# Altium PCB NB2DSK01.PcbDoc (part 11 of 17)
Units mil, origin at the board's own origin, x right, y up, seen from the top; angles counter-clockwise.
Board outline 11815 x 6500.03 mil, 8 copper layers (Top Layer, MidLayer1, MidLayer2, GND, PWR, MidLayer3, MidLayer4, Bottom Layer), stack 74.62 mil thick; 798 components, 1002 nets, 3927 pads, 3182 vias.
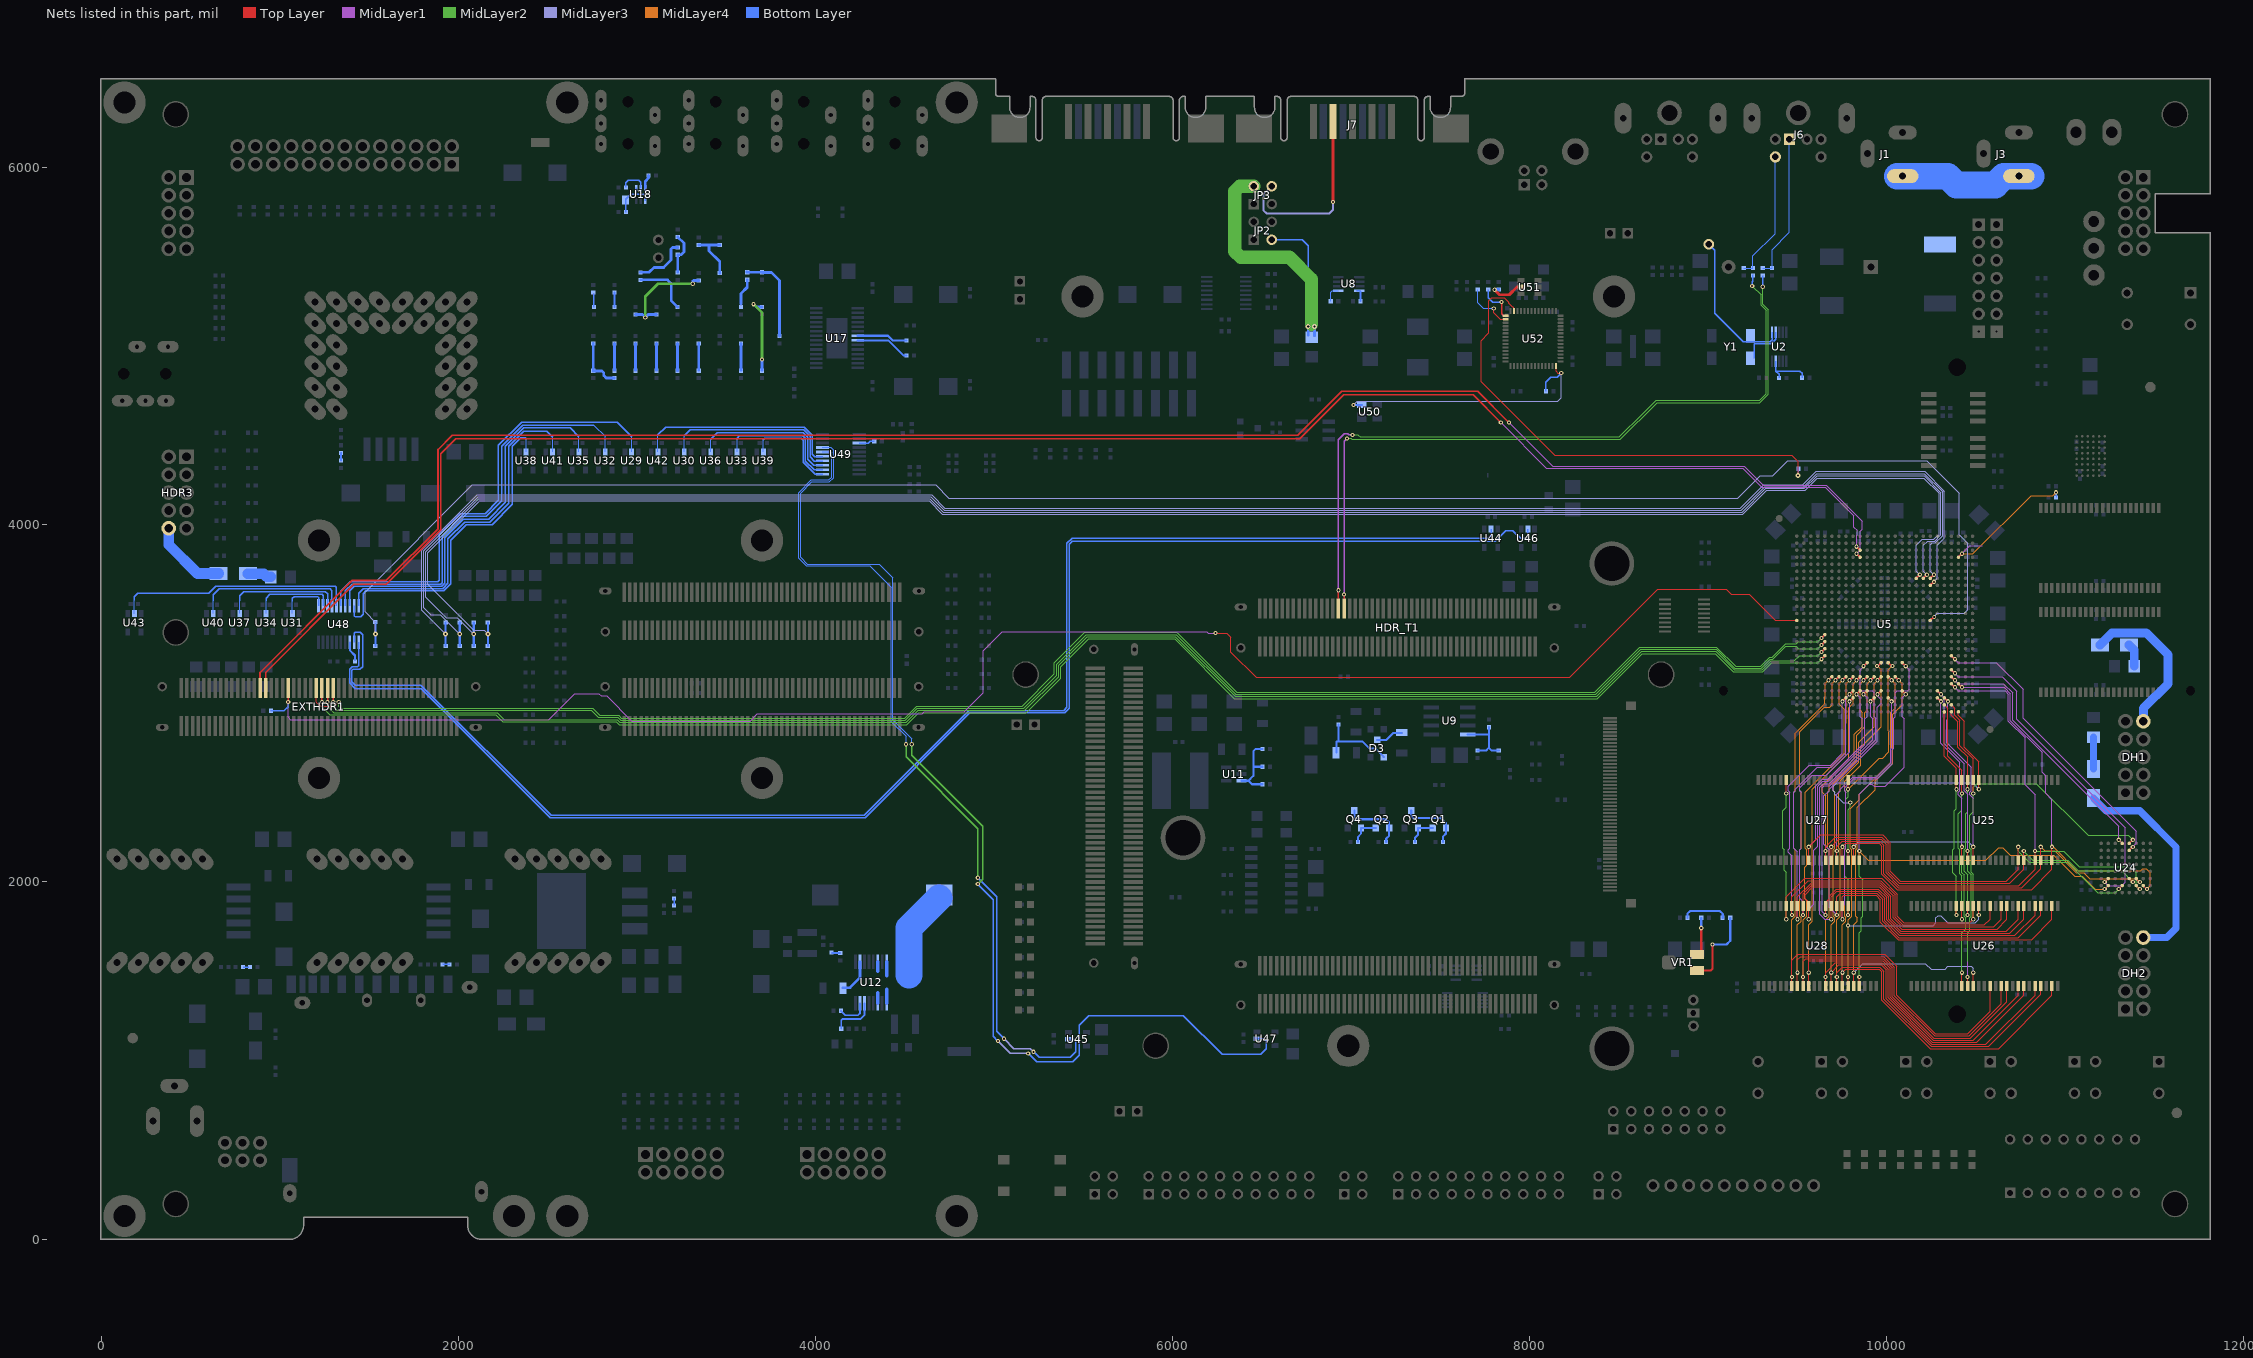
[diagram p17: the nets of this part, all layers, seen from the top]

## Via types
v1: diameter 23.62, hole 11.81, Top Layer to Bottom Layer, tented both sides, 1950 vias
v2: diameter 27.56, hole 11.81, Top Layer to Bottom Layer, tented both sides, 679 vias
v3: diameter 23.62, hole 11.81, Top Layer to Bottom Layer, 194 vias
v4: diameter 31.5, hole 11.81, Top Layer to Bottom Layer, tented both sides, 178 vias
v5: diameter 21.65, hole 11.81, Top Layer to Bottom Layer, tented both sides, 67 vias
v6: diameter 23.62, hole 11.81, Top Layer to Bottom Layer, tented bottom, 53 vias
v7: diameter 26, hole 11.81, Top Layer to Bottom Layer, tented both sides, 21 vias
v8: diameter 26, hole 11.81, Top Layer to Bottom Layer, 13 vias
v9: diameter 28, hole 11.81, Top Layer to Bottom Layer, 8 vias
v10: diameter 25.59, hole 11.81, Top Layer to Bottom Layer, tented both sides, 7 vias
v11: diameter 39.37, hole 11.81, Top Layer to Bottom Layer, tented both sides, 5 vias
v12: diameter 30, hole 11.81, Top Layer to Bottom Layer, 3 vias
v13: diameter 30, hole 11.81, Top Layer to Bottom Layer, tented both sides, 2 vias
v14: diameter 23, hole 11.81, Top Layer to Bottom Layer, tented both sides, 1 vias
v15: diameter 26.56, hole 11.81, Top Layer to Bottom Layer, tented both sides, 1 vias

## Nets (pads, with @x,y where several pads share a name; then routed paths per layer and width w, separated by ;. In a path a pad name is that pad's centre, name@x,y a point inside that pad or via, vN(x,y) a via of type N, cw(c..) or ccw(c..) an arc to the next point about the centre after c; other vN are vias at no path point) (continued)
MEM.BUS_D11: U5.AC10 U24.G4 U25.47 U27.32 | length 3388.4
  Top Layer w5: U27.32@9562.99,2122.05 v1(9562.99,2196.85) 9629.92,2263.78 9976.38,2263.78 10019.69,2220.47 10019.69,2059.06 10074.8,2003.94 10669.29,2003.94 10736.22,2070.87 U25.47@10736.22,2122.05 v1(10736.22,2196.85) ; v1(11299.21,1960.45) U24.G4@11318.9,1980.14
  Top Layer w7.87: v1(9830.71,3051.18) U5.AC10@9850.39,3070.87
  MidLayer1 w5: v1(9562.99,2196.85) 9602.36,2236.22 9602.36,2539.37 9637.8,2574.8 9669.29,2574.8 9862.2,2767.72 9862.2,2870.08 9862.2,2889.76 9862.2,2913.39 9850.39,2925.2 9850.39,3031.5 v1(9830.71,3051.18)
  MidLayer2 w5: v1(10736.22,2196.85) 10736.22,2173.23 10799.21,2110.24 11011.81,2110.24 11181.55,1940.5 11279.26,1940.5 v1(11299.21,1960.45)
MEM.BUS_D12: U5.AA10 U24.F5 U25.48 U27.35 | length 3327.5
  Top Layer w5: U27.35@9657.48,2122.05 v1(9657.48,2173.23) 9657.48,2196.85 9712.6,2251.97 9972.44,2251.97 10007.87,2216.54 10007.87,2055.12 10070.87,1992.13 10688.98,1992.13 10767.72,2070.87 U25.48@10767.72,2122.05 v1(10767.72,2173.23) ; U24.F5@11358.27,2019.51 v1(11377.95,1999.82)
  Top Layer w7.87: v1(9830.71,3129.92) U5.AA10@9850.39,3149.61
  MidLayer2 w5: v1(10767.72,2173.23) 10818.9,2122.05 11014.14,2122.05 11073.38,2062.81 11314.96,2062.81 v1(11377.95,1999.82)
  MidLayer4 w5: v1(9657.48,2173.23) 9657.48,2484.25 9637.8,2503.94 9637.8,2539.37 9754.26,2655.84 9787.4,2688.98 9787.4,2870.08 9787.4,2889.76 9787.4,2976.38 9811.02,3000 9811.02,3110.24 v1(9830.71,3129.92)
MEM.BUS_D13: U5.AB23 U24.G6 U25.50 U27.36 | length 3604.8
  Top Layer w5: U27.36@9688.98,2122.05 v1(9688.98,2196.85) 9732.28,2240.16 9968.5,2240.16 9996.06,2212.6 9996.06,2051.18 10066.93,1980.32 10740.16,1980.32 10830.71,2070.87 U25.50@10830.71,2122.05 v1(10830.71,2173.23) ; U24.G6@11397.64,1980.14 v1(11417.32,1960.45)
  Top Layer w7.87: U5.AB23@10362.2,3110.24 v1(10381.89,3090.55)
  MidLayer1 w5: v1(10381.89,3090.55) 10401.58,3070.87 10663.02,3070.87 10681.1,3052.79 10681.1,2901.03 10775.59,2806.54 10775.59,2543.31 10830.71,2488.19 v1(10830.71,2173.23)
  MidLayer2 w5: v1(10830.71,2173.23) 10991.25,2173.23 11078.04,2086.44 11362.2,2086.44 11397.64,2051 11397.64,1980.14 v1(11417.32,1960.45)
MEM.BUS_D14: U5.AD14 U24.F6 U25.51 U27.37 | length 3331.5
  Top Layer w5: U27.37@9720.47,2122.05 9720.47,2196.85 9751.97,2228.35 9960.63,2228.35 9984.25,2204.72 9984.25,2047.24 10062.99,1968.5 10755.91,1968.5 10862.21,2074.8 U25.51@10862.21,2122.05 v1(10862.21,2196.85) ; U24.F6@11397.64,2019.51 v1(11417.32,1999.82)
  Top Layer w7.87: U5.AD14@10007.87,3031.5 v1(10027.56,3011.81)
  MidLayer1 w5: v1(9720.47,2173.23) 9720.47,2492.13 9740.16,2511.81 9740.16,2519.69 9808.47,2588 9941.3,2588 10021,2667.7 10021,2745.41 10027.56,2751.97 10027.56,2870.08 10027.56,2889.77 v1(10027.56,3011.81)
  MidLayer4 w5: v1(10862.21,2196.85) 10884.56,2174.49 10939.51,2174.49 11061.18,2052.82 11103.61,2052.82 11136.92,2019.51 11397.64,2019.51 v1(11417.32,1999.82)
MEM.BUS_D15: U5.AB24 U24.G7 U25.53 U27.38 | length 3639.8
  Top Layer w5: U27.38@9751.97,2122.05 v1(9751.97,2196.85) 9771.65,2216.54 9956.69,2216.54 9972.44,2200.79 9972.44,2043.31 10059.06,1956.69 10811.02,1956.69 10925.2,2070.87 U25.53@10925.2,2122.05 v1(10925.2,2196.85) ; U24.G7@11437.01,1980.14 v1(11456.69,1960.45)
  Top Layer w7.87: U5.AB24@10401.58,3110.24 v1(10421.26,3090.55)
  MidLayer1 w5: v1(10421.26,3090.55) 10543.31,3090.55 10562.99,3090.55 10657.48,3090.55 10692.91,3055.12 10692.91,2903.36 10870.08,2726.2 10870.08,2614.17 10889.76,2594.49 10889.76,2496.06 10925.2,2460.63 v1(10925.2,2196.85)
  MidLayer4 w5: v1@10931.29,2196.85 11065.33,2062.82 11421.26,2062.82 11433.07,2074.63 11452.76,2074.63 11476.38,2051 11476.38,1980.14 v1(11456.69,1960.45)
MEM.BUS_D16: U5.W16 U26.2 U28.7 | length 3327.3
  Top Layer w5: v1(9751.97,1791.34) U28.7@9751.97,1866.14 9751.97,1917.32 9759.84,1925.2 9940.94,1925.2 9964.57,1901.57 9964.57,1775.59 10062.99,1677.17 10811.02,1677.17 10925.2,1791.34 U26.2@10925.2,1866.14
  Top Layer w7.87: U5.W16@10086.61,3228.35 v1(10106.3,3208.66)
  MidLayer1 w5: v1(9751.97,1791.34) 9751.97,1862.2 9763.78,1874.02 9763.78,2181.1 9771.65,2188.98 9771.65,2503.94 9763.78,2511.81 9763.78,2527.56 9814.22,2578 9945.44,2578 10031,2663.56 10031,2739.66 10039.37,2748.03 10039.37,2870.08 10039.37,2889.76 10039.37,2917.32 10047.24,2925.2 10047.24,3059.06 10059.06,3070.87 10118.11,3070.87 10125.98,3078.74 10125.98,3188.98 v1(10106.3,3208.66)
MEM.BUS_D17: U5.AC13 U26.4 U28.8 | length 2966.9
  Top Layer w5: v1(9720.47,1814.96) U28.8@9720.47,1866.14 9720.47,1917.32 9740.16,1937.01 9943.27,1937.01 9976.38,1903.9 9976.38,1779.53 10066.93,1688.98 10737.18,1688.98 10862.21,1814 U26.4@10862.21,1866.14
  Top Layer w7.87: v1(9948.82,3051.18) U5.AC13@9968.5,3070.87
  MidLayer1 w5: v1(9720.47,1814.96) 9696.85,1838.58 9677.5,1857.93 9677.5,2180.7 9647.8,2210.4 9647.8,2482.2 9676.79,2511.19 9676.79,2519.31 9947.01,2789.53 9947.01,2978.5 9968.5,3000 9968.5,3020.8 9948.82,3040.48 v1(9948.82,3051.18)
MEM.BUS_D18: U5.AD12 U26.5 U28.9 | length 2996.6
  Top Layer w5: v1(9688.98,1791.34) U28.9@9688.98,1866.14 9688.98,1917.32 9720.47,1948.82 9948.82,1948.82 9988.19,1909.45 9988.19,1783.46 10070.87,1700.79 10716.5,1700.79 10830.71,1815 U26.5@10830.71,1866.14
  Top Layer w7.87: v1(9909.45,3011.81) U5.AD12@9929.13,3031.5
  MidLayer1 w5: v1(9688.98,1791.34) 9653.54,1791.34 9625.98,1818.9 9625.98,2531.5 9645.67,2551.18 9677.17,2551.18 9921.26,2795.28 9921.26,2870.08 9921.26,2889.76 9921.26,2913.39 9909.45,2925.2 v1(9909.45,3011.81)
MEM.BUS_D19: U5.W11 U26.7 U28.10 | length 3141.9
  Top Layer w5: U28.10@9653.54,1881.89 9677.17,1905.51 9677.17,1921.26 9716.54,1960.63 9952.76,1960.63 10000,1913.39 10000,1787.4 10074.8,1712.6 10688.98,1712.6 10767.72,1791.34 U26.7@10767.72,1866.14 ; v1(9657.48,1814.96) U28.10@9657.48,1866.14
  Top Layer w7.87: v1(9870.08,3208.66) U5.W11@9889.76,3228.35
  MidLayer1 w5: v1(9657.48,1814.96) 9637.8,1834.65 9637.8,2527.56 9649.61,2539.37 9681.1,2539.37 9937.01,2795.28 9937.01,2870.08 9937.01,2889.76 9937.01,2917.32 9929.13,2925.2 9929.13,3059.06 9917.32,3070.87 9858.27,3070.87 9850.39,3078.74 9850.39,3188.98 v1(9870.08,3208.66)
MEM.BUS_D20: U5.AC11 U26.8 U28.13 | length 3065.8
  Top Layer w5: v1(9562.99,1791.34) U28.13@9562.99,1866.14 ; U28.13@9562.99,1885.83 9543.31,1905.51 9543.31,1929.13 9586.61,1972.44 9956.69,1972.44 10011.81,1917.32 10011.81,1791.34 10078.74,1724.41 10669.29,1724.41 10736.22,1791.34 U26.8@10736.22,1866.14
  Top Layer w7.87: v1(9870.08,3051.18) U5.AC11@9889.76,3070.87
  MidLayer1 w5: v1(9562.99,1791.34) 9562.99,1846.46 9590.55,1874.02 9590.55,2177.17 9614.17,2200.79 9614.17,2535.43 9641.73,2562.99 9673.23,2562.99 9877.95,2767.72 9877.95,2870.08 9877.95,2889.76 9877.95,2913.39 9889.76,2925.2 9889.76,3031.5 v1(9870.08,3051.18)
MEM.BUS_D21: U5.AD9 U26.10 U28.14 | length 2956.5
  Top Layer w5: v1(9531.5,1814.96) U28.14@9531.5,1866.14 9531.5,1933.07 9582.68,1984.25 9960.63,1984.25 10023.62,1921.26 10023.62,1795.28 10082.68,1736.22 10618.11,1736.22 10673.23,1791.34 U26.10@10673.23,1866.14
  Top Layer w7.87: v1(9791.34,3011.81) U5.AD9@9811.02,3031.5
  MidLayer1 w5: v1(9531.5,1814.96) 9531.5,1889.76 9511.81,1909.45 9511.81,2181.1 9519.69,2188.98 9519.69,2503.94 9511.81,2511.81 9511.81,2527.56 9582.68,2598.43 9661.42,2598.43 9791.34,2728.35 9791.34,2870.08 9791.34,2889.77 v1(9791.34,3011.81)
MEM.BUS_D22: U5.AC9 U26.11 U28.15 | length 3039.5
  Top Layer w5: v1(9500,1791.34) U28.15@9500,1866.14 9500,1917.32 9578.74,1996.06 9962.96,1996.06 10035.43,1923.59 10035.43,1799.21 10086.61,1748.03 10598.42,1748.03 10641.73,1791.34 U26.11@10641.73,1866.14
  Top Layer w7.87: v1(9791.34,3051.18) U5.AC9@9811.02,3070.87
  MidLayer1 w5: v1(9500,1791.34) 9500,2169.29 9480.32,2188.98 9480.32,2503.94 9488.19,2511.81 9488.19,2519.69 9610.24,2641.73 9688.98,2641.73 9771.65,2724.41 9771.65,2870.08 9771.65,2889.76 9771.65,3031.5 v1(9791.34,3051.18)
MEM.BUS_D23: U5.AD8 U26.13 U28.16 | length 2947.9
  Top Layer w5: v1(9468.5,1814.96) U28.16@9468.5,1866.14 9468.5,1917.32 9559.06,2007.87 9967.26,2007.87 10047.24,1927.89 10047.24,1803.15 10090.55,1759.84 10547.24,1759.84 10578.74,1791.34 U26.13@10578.74,1866.14
  Top Layer w7.87: v1(9751.97,3011.81) U5.AD8@9771.65,3031.5
  MidLayer1 w5: v1(9468.5,1814.96) 9468.5,2145.67 9448.82,2165.35 9448.82,2181.1 9456.69,2188.98 9456.69,2503.94 9448.82,2511.81 9448.82,2535.43 9566.93,2653.54 9685.04,2653.54 9751.97,2720.47 v1(9751.97,3011.81)
MEM.BUS_D24: U5.AA6 U26.42 U28.29 | length 3522
  Top Layer w5: U28.29@9468.5,1417.32 v1(9468.5,1468.5) 9468.5,1562.5 9500.49,1594.49 9988.19,1594.49 10055.12,1527.56 10055.12,1366.14 10271.65,1149.61 10452.76,1149.61 10578.74,1275.59 U26.42@10578.74,1417.32
  Top Layer w7.87: v1(9673.23,3129.92) U5.AA6@9692.91,3149.61
  MidLayer4 w5: v1(9468.5,1468.5) 9468.5,1787.4 9488.19,1807.09 9488.19,2181.1 9480.32,2188.98 9480.32,2503.94 9488.19,2511.81 9488.19,2833.19 9653.54,2998.54 9653.54,3034.59 9653.54,3110.23 v1(9673.23,3129.92)
MEM.BUS_D25: U5.AA7 U26.44 U28.30 | length 3534.2
  Top Layer w5: U28.30@9500,1417.32 v1(9500,1492.13) 9500,1564 9518.68,1582.68 9984.25,1582.68 10043.31,1523.62 10043.31,1362.2 10267.72,1137.8 10460.63,1137.8 10641.73,1318.9 U26.44@10641.73,1417.32
  Top Layer w7.87: v1(9712.6,3129.92) U5.AA7@9732.28,3149.61
  MidLayer4 w5: v1(9500,1492.13) 9500,1759.84 9519.69,1779.53 9519.69,1799.21 9511.81,1807.09 9511.81,2181.1 9519.69,2188.98 9519.69,2503.94 9511.81,2511.81 9511.81,2842.67 9649.14,2980 9681.68,2980 9692.91,2991.24 9692.91,3110.23 v1(9712.6,3129.92)
MEM.BUS_D26: U5.AA8 U26.45 U28.31 | length 3558.3
  Top Layer w5: U28.31@9531.5,1417.32 v1(9531.5,1468.5) 9531.5,1556.5 9545.87,1570.87 9980.32,1570.87 10031.5,1519.69 10031.5,1358.27 10263.78,1125.98 10468.5,1125.98 10673.23,1330.71 U26.45@10673.23,1417.32
  Top Layer w7.87: v1(9751.97,3129.92) U5.AA8@9771.65,3149.61
  MidLayer4 w5: v1(9531.5,1468.5) 9531.5,1787.4 9551.18,1807.09 9551.18,1893.7 9539.37,1905.51 9539.37,2082.68 9551.18,2094.49 9551.18,2181.1 9543.31,2188.98 9543.31,2503.94 9761.65,2722.28 9761.65,2968.43 9732.28,2997.8 9732.28,3110.23 v1(9751.97,3129.92)
MEM.BUS_D27: U5.AA9 U26.47 U28.32 | length 3508.5
  Top Layer w5: U28.32@9562.99,1417.32 v1(9562.99,1492.13) 9562.99,1557.29 9564.76,1559.06 9976.38,1559.06 10019.69,1515.75 10019.69,1354.33 10259.84,1114.17 10484.25,1114.17 10736.22,1366.14 U26.47@10736.22,1417.32
  Top Layer w7.87: v1(9791.34,3129.92) U5.AA9@9811.02,3149.61
  MidLayer4 w5: v1(9562.99,1492.13) 9562.99,1759.84 9582.68,1779.53 9582.68,2519.69 9771.65,2708.66 9771.65,2870.08 9771.65,2889.76 9771.65,3110.23 v1(9791.34,3129.92)
MEM.BUS_D28: U5.AA11 U26.48 U28.35 | length 3440.8
  Top Layer w5: U28.35@9657.48,1417.32 v1(9657.48,1468.5) 9657.48,1492.13 9712.6,1547.24 9972.44,1547.24 10007.87,1511.81 10007.87,1350.39 10255.91,1102.36 10503.94,1102.36 10767.72,1366.14 U26.48@10767.72,1417.32
  Top Layer w7.87: v1(9870.08,3129.92) U5.AA11@9889.76,3149.61
  MidLayer4 w5: v1(9657.48,1468.5) 9657.48,1787.4 9677.17,1807.09 9677.17,2181.1 9669.29,2188.98 9669.29,2503.94 9677.17,2511.81 9677.17,2547.24 9818.9,2688.98 9818.9,2826.77 9862.2,2870.08 9862.2,2889.76 9862.2,2948.82 9850.39,2960.63 9850.39,3110.24 v1(9870.08,3129.92)
MEM.BUS_D29: U5.AA12 U26.50 U28.36 | length 3448.6
  Top Layer w5: U28.36@9688.98,1417.32 v1(9688.98,1492.13) 9732.28,1535.43 9968.5,1535.43 9996.06,1507.87 9996.06,1346.46 10251.97,1090.55 10555.12,1090.55 10830.71,1366.14 U26.50@10830.71,1417.32
  Top Layer w7.87: v1(9909.45,3129.92) U5.AA12@9929.13,3149.61
  MidLayer4 w5: v1(9688.98,1492.13) 9688.98,1759.84 9708.66,1779.53 9708.66,1799.21 9700.79,1807.09 9700.79,2181.1 9708.66,2188.98 9708.66,2503.94 9700.79,2511.81 9700.79,2551.18 9830.71,2681.1 9830.71,2822.84 9877.95,2870.08 9877.95,2889.76 9877.95,2948.82 9889.76,2960.63 9889.76,3110.24 v1(9909.45,3129.92)
MEM.BUS_D30: U5.AA13 U26.51 U28.37 | length 3464.4
  Top Layer w5: U28.37@9720.47,1417.32 v1(9720.47,1468.5) 9720.47,1492.13 9751.97,1523.62 9960.63,1523.62 9984.25,1500 9984.25,1342.52 10248.03,1078.74 10570.87,1078.74 10862.21,1370.08 U26.51@10862.21,1417.32
  Top Layer w7.87: v1(9948.82,3129.92) U5.AA13@9968.5,3149.61
  MidLayer4 w5: v1(9720.47,1468.5) 9720.47,1787.4 9740.16,1807.09 9740.16,2181.1 9732.28,2188.98 9732.28,2503.94 9740.16,2511.81 9740.16,2566.93 9842.52,2669.29 9842.52,2783.47 9929.13,2870.08 9929.13,2889.76 9929.13,3110.24 v1(9948.82,3129.92)
MEM.BUS_D31: U5.W13 U26.53 U28.38 | length 3563.1
  Top Layer w5: U28.38@9751.97,1417.32 v1(9751.97,1492.13) 9771.65,1511.81 9956.69,1511.81 9972.44,1496.06 9972.44,1338.58 10244.09,1066.93 10625.99,1066.93 10925.2,1366.14 U26.53@10925.2,1417.32
  Top Layer w7.87: v5@9948.82,3208.66 U5.W13@9968.5,3228.35
  MidLayer4 w5: v1(9751.97,1492.13) 9751.97,1759.84 9771.65,1779.53 9771.65,1799.21 9763.78,1807.09 9763.78,2181.1 9771.65,2188.98 9771.65,2503.94 9763.78,2511.81 9763.78,2562.99 9854.33,2653.54 9854.33,2755.91 9968.5,2870.08 9968.5,2889.76 9968.5,3188.98 v5@9948.82,3208.66
  other v5: 9944.88,3208.66
MEM.BUS_FLASH_NBUSY: U5.AA23 U24.A4 | length 1477.1
  Top Layer w5: v1(11299.21,2236.04) U24.A4@11318.9,2216.36
  Top Layer w7.87: U5.AA23@10362.2,3149.61 v1(10381.89,3129.92)
  MidLayer1 w5: v1(10381.89,3129.92) 10401.58,3110.24 10543.31,3110.24 10562.99,3110.24 10653.54,3110.24 10704.72,3059.06 10704.72,2905.69 11299.21,2311.2 v1(11299.21,2236.04)
MEM.BUS_FLASH_NCS: U5.Y23 U24.F2 | length 1893.3
  Top Layer w5: v1(11220.47,1999.82) U24.F2@11240.16,2019.51
  Top Layer w7.87: U5.Y23@10362.2,3188.98 v1(10381.89,3169.29)
  MidLayer1 w5: v1(10381.89,3169.29) 10401.58,3149.61 10543.31,3149.61 10562.99,3149.61 10645.67,3149.61 10728.35,3066.93 10728.35,2910.36 11334.65,2304.06 11334.65,1999.82 11314.96,1980.14 11240.16,1980.14 v1(11220.47,1999.82)
MEM.BUS_FLASH_NRESET: U5.V23 U24.B5 | length 1660.5
  Top Layer w5: U24.B5@11358.27,2176.99 v1(11377.95,2196.67)
  Top Layer w7.87: U5.V23@10362.2,3267.72 v1(10381.89,3248.03)
  MidLayer1 w5: v1(10381.89,3248.03) 10401.58,3228.35 10543.31,3228.35 10562.99,3228.35 10614.17,3228.35 10763.78,3078.74 10763.78,2917.35 11397.64,2283.49 11397.64,2216.36 v1(11377.95,2196.67)
MEM.BUS_NBE0: U5.AF24 U25.15 U27.39 | length 1798.6
  Top Layer w5: U27.39@9783.46,2122.05 v1(9783.46,2173.23) ; U5.AF24@10401.58,2952.76 10401.58,2933.07 10433.07,2901.58 10433.07,2889.77 10433.07,2870.08 10433.07,2755.91 10515.75,2673.23 U25.15@10515.75,2570.87 v1(10515.75,2519.69)
  MidLayer2 w5: v1(9783.46,2173.23) 9783.46,2405.51 9795.28,2417.32 v1(9795.28,2444.88)
  MidLayer3 w5: v1(9795.28,2444.88) 9755.91,2444.88 9708.66,2492.13 9708.66,2503.94 9700.79,2511.81 9700.79,2535.43 9720.47,2555.12 10480.32,2555.12 v1(10515.75,2519.69)
MEM.BUS_NBE1: U5.AD22 U25.39 U27.40 | length 1755.4
  Top Layer w5: U27.40@9814.96,2122.05 v1(9814.96,2196.85) ; U25.39@10484.25,2122.05 v1(10484.25,2196.85)
  Top Layer w7.87: U5.AD22@10322.83,3031.5 v1(10342.52,3011.81)
  MidLayer1 w5: v1(10342.52,3011.81) 10342.52,2913.24 10335.68,2906.4 10335.68,2778.45 10472.44,2641.69 10472.44,2511.81 10464.57,2503.94 10464.57,2488.19 10484.25,2468.5 v1(10484.25,2196.85)
  MidLayer3 w5: v1(9814.96,2196.85) 9842.52,2224.41 10456.69,2224.41 v1(10484.25,2196.85)
MEM.BUS_NBE2: U5.AA14 U26.15 U28.39 | length 2734.9
  Top Layer w5: U28.39@9783.46,1417.32 v1(9783.46,1468.5) ; v1(10515.75,1814.96) U26.15@10515.75,1866.14
  Top Layer w7.87: U5.AA14@10007.87,3149.61 v1(10027.56,3129.92)
  MidLayer4 w5: v1(9783.46,1468.5) v1(9783.46,1755.91) 9783.46,1787.4 9803.15,1807.09 9803.15,2181.1 9795.28,2188.98 9795.28,2409.45 9846.46,2460.63 9846.46,2492.13 10023.68,2669.35 10023.68,2950.44 10047.24,2974 10047.24,3110.24 v1(10027.56,3129.92)
  MidLayer3 w5: v1(9783.46,1755.91) 10259.84,1755.91 10275.59,1771.65 10275.59,1799.21 10287.4,1811.02 10303.15,1811.02 10342.52,1771.65 10496.06,1771.65 10515.75,1791.34 v1(10515.75,1814.96)
MEM.BUS_NBE3: U5.AA15 U26.39 U28.40 | length 2681
  Top Layer w5: U28.40@9814.96,1417.32 v1(9814.96,1492.13) ; U26.39@10484.25,1417.32 v1(10484.25,1492.13)
  Top Layer w7.87: U5.AA15@10047.24,3149.61 v1(10066.93,3129.92)
  MidLayer4 w5: v1(9814.96,1492.13) 9814.96,1759.84 9834.65,1779.53 9834.65,1799.21 9826.77,1807.09 9826.77,2181.1 9834.65,2188.98 9834.65,2417.32 9934.68,2517.35 9934.68,2566.2 10034.9,2666.43 10034.9,2940.29 10086.61,2992 10086.61,3110.24 v1(10066.93,3129.92)
  MidLayer3 w5: v1(9814.96,1492.13) 9866.14,1543.31 10216.53,1543.31 10248.03,1511.81 10326.77,1511.81 10342.52,1527.56 10472.44,1527.56 10484.25,1515.75 v1(10484.25,1492.13)
MEM.BUS_NOE: U5.AC16 U24.G2 U27.41 U28.41 | length 3466.3
  Top Layer w5: U28.41@9846.46,1417.32 v1(9846.46,1468.5) ; U27.41@9846.46,2122.05 v1(9846.46,2173.23) ; v1(11220.47,1960.45) U24.G2@11240.16,1980.14
  Top Layer w7.87: U5.AC16@10086.61,3070.87 v1(10106.3,3051.18)
  MidLayer1 w5: v1(9846.46,2173.23) 9846.46,2492.13 9902.76,2548.44 9916,2548.44 9928.98,2535.45 9992.62,2535.45 10098.43,2641.26 10098.43,2913.39 10086.62,2925.2 10086.62,3031.5 v1(10106.3,3051.18)
  MidLayer2 w5: v1(9846.46,1468.5) 9846.46,1716.54 9858.27,1728.35 9858.27,1799.21 9866.14,1807.09 9866.14,2011.81 9846.46,2031.5 v1(9846.46,2173.23)
  MidLayer4 w5: v1(9846.46,2173.23) 9897.64,2122.05 10555.12,2122.05 10625.98,2192.91 10649.61,2192.91 10692.07,2150.45 10935.26,2150.45 11052.9,2032.82 11095.32,2032.82 11167.69,1960.45 v1(11220.47,1960.45)
MEM.BUS_NWE: U5.AE23 U24.A5 U25.16 U26.16 U27.17 U28.17 | length 4633.7
  Top Layer w5: v1(9437.01,1791.34) U28.17@9437.01,1866.14 9437.01,1917.32 9539.37,2019.69 9971.45,2019.69 10059.06,1932.08 10059.06,1807.09 10094.49,1771.65 10464.57,1771.65 v1(10484.25,1791.34) U26.16@10484.25,1866.14 ; v1(9437.01,2496.06) U27.17@9437.01,2570.87 ; U5.AE23@10362.2,2992.13 10381.89,2972.44 10381.89,2933.07 10409.45,2905.51 10409.45,2889.76 10409.45,2870.08 10409.45,2763.78 10484.25,2688.98 U25.16@10484.25,2570.87 v1(10484.25,2496.06) ; U24.A5@11358.27,2216.36 v1(11377.95,2236.04)
  MidLayer2 w5: v1(9437.01,1791.34) 9437.01,2011.81 9437.01,2055.12 9425.2,2066.93 9425.2,2181.1 9417.32,2188.98 9417.32,2397.64 9437.01,2417.32 v1(9437.01,2496.06) ; v1(10484.25,1791.34) 10484.25,2043.31 10472.44,2055.12 10472.44,2181.1 10464.57,2188.98 10464.57,2374.02 10484.25,2393.7 v1(10484.25,2496.06) 10484.25,2531.5 10503.94,2551.18 10837.12,2551.18 11127.1,2261.2 11352.8,2261.2 v1(11377.95,2236.04)
MEM.BUS_SDRAM_CKE: U5.AD21 U25.37 U26.37 | length 1768.9
  Top Layer w5: U26.37@10421.26,1417.32 v1(10421.26,1492.13) ; U25.37@10421.26,2122.05 v1(10421.26,2196.85)
  Top Layer w7.87: U5.AD21@10283.46,3031.5 v1(10303.15,3011.81)
  MidLayer1 w5: v1(10303.15,3011.81) 10303.15,2889.76 10303.15,2870.08 10303.15,2776.99 10409.45,2670.68 10409.45,2511.81 10401.58,2503.94 10401.58,2488.19 10421.26,2468.5 v1(10421.26,2196.85)
  MidLayer2 w5: v1(10421.26,1492.13) 10421.26,1716.54 10440.95,1736.22 10440.95,1799.21 10433.07,1807.09 10433.07,2039.37 10421.26,2051.18 10421.26,2059.06 v1(10421.26,2196.85)
MEM.BUS_SDRAM_CLK: NT3.2 U5.AC21 U25.38 U26.38 | length 1875
  Top Layer w5: U26.38@10452.76,1417.32 v1(10452.76,1468.5) ; U25.38@10452.76,2122.05 v1(10452.76,2173.23)
  Top Layer w7.87: U5.AC21@10283.46,3070.87 v1(10303.15,3051.18)
  MidLayer1 w5: v1(10303.15,3051.18) 10322.83,3031.5 10322.83,2889.76 10322.83,2870.08 10322.83,2773.3 10433.07,2663.06 10433.07,2511.81 10452.76,2492.13 v1(10452.76,2173.23) ; v1(10452.76,1468.5) NT3.2@10452.76,1552.36
  MidLayer2 w5: v1(10452.76,1468.5) 10452.76,1716.54 10464.57,1728.35 10464.57,1799.21 10472.44,1807.09 10472.44,2039.37 10452.76,2059.06 v1(10452.76,2173.23)
MEM.BUS_SDRAM_NCAS: U5.AF23 U25.17 U26.17 | length 1242.8
  Top Layer w5: U5.AF23@10362.2,2952.76 10362.21,2933.07 10397.64,2897.64 10397.64,2889.76 10397.64,2870.08 10397.64,2755.91 10452.76,2700.79 U25.17@10452.76,2570.87 v1(10452.76,2519.69) ; v1(10452.76,1814.96) U26.17@10452.76,1866.14
  MidLayer2 w5: v1(10452.76,1814.96) 10452.76,2039.37 10433.07,2059.06 10433.07,2181.1 10440.95,2188.98 10440.95,2381.89 10452.76,2393.7 v1(10452.76,2519.69)
MEM.BUS_SDRAM_NCS: U5.AF22 U25.19 U26.19 | length 1233
  Top Layer w5: U5.AF22@10322.83,2952.76 10322.84,2704.3 10389.76,2637.37 U25.19@10389.76,2570.87 v1(10389.76,2519.69) ; v1(10389.76,1814.96) U26.19@10389.76,1866.14
  MidLayer2 w5: v1(10389.76,1814.96) 10389.76,2031.49 10370.08,2051.18 10370.08,2181.1 10377.95,2188.98 10377.95,2397.64 10389.76,2409.45 v1(10389.76,2519.69)
MEM.BUS_SDRAM_NRAS: U5.AE22 U25.18 U26.18 | length 1332.7
  Top Layer w5: U5.AE22@10322.83,2992.13 10342.52,2972.44 10342.52,2705.61 10421.26,2626.87 U25.18@10421.26,2570.87 v1(10421.26,2496.06) ; v1(10421.26,1791.34) U26.18@10421.26,1866.14
  MidLayer2 w5: v1(10421.26,1791.34) 10421.26,2035.43 10409.45,2047.24 10409.45,2181.1 10401.58,2188.98 10401.58,2381.89 10421.26,2401.58 v1(10421.26,2496.06)
MEM.BUS_SRAM_NCS: U5.W14 U27.6 U28.6 | length 1656.1
  Top Layer w5: v1(9783.46,1814.96) U28.6@9783.46,1866.14 ; v1(9783.46,2519.69) U27.6@9783.46,2570.87
  Top Layer w7.87: U5.W14@10007.87,3228.35 v5@10027.56,3208.66
  MidLayer2 w5: v1(9783.46,1814.96) 9783.46,2011.81 9763.78,2031.5 9763.78,2181.1 9771.65,2188.98 9771.65,2464.57 9783.46,2476.38 v1(9783.46,2519.69)
  MidLayer4 w5: v1(9783.46,2519.69) 9929.13,2665.36 9956.69,2692.91 9976.38,2692.91 10011.81,2728.35 10011.81,2748.03 10011.81,2842.52 10007.87,2846.46 10007.87,2870.08 10007.87,2889.76 10007.87,3188.98 v5@10027.56,3208.66
  other v5: 10031.5,3208.66
MOUSE#.CLOCK: J6.5 R88.2 R91.2 | length 727
  Bottom Layer w5: R88.2@9198.54,5437.76 R91.2@9250.16,5437.76 9250.16,5505.87 9375.98,5631.7 J6.5@9375.98,6061.02
MOUSE#.DATA: J6.1 R89.2 R90.2 | length 813.7
  Bottom Layer w5: R90.2@9305.71,5437.76 R89.2@9357.32,5437.76 9357.32,5540.2 9454.72,5637.6 J6.1@9454.72,6159.45
MOUSE.CLOCK: HDR_T1.30 R91.1 | length 4267
  Top Layer w5: HDR_T1.30@6929.13,3531.5 v1@6929.13,3637.8
  Top Layer w7.87: HDR_T1.30@6929.13,3531.5 v1(6929.13,3633.86)
  MidLayer1 w7.87: v1(6929.13,3633.86) 6929.13,4476.23 6962.23,4509.33 6982.47,4509.33 6987.86,4503.94 v1(7007.87,4503.94)
  MidLayer2 w5: v1(7007.87,4503.94) 7041.17,4503.94 ; 7041.17,4503.15 7051.87,4492.45 8502.68,4492.45 8633.86,4623.63 8708.23,4698 9287.86,4698 9325,4735.14 9325,5201.36 9295.71,5230.65 9295.71,5288.35 v1(9246.22,5337.83)
  Bottom Layer w7.87: v1(9246.22,5337.83) 9246.22,5360.81 9250.16,5364.74 R91.1@9250.16,5395.39 R91.1@9250.16,5400.04
MOUSE.DATA: HDR_T1.32 R90.1 | length 4100.6
  Top Layer w7.87: HDR_T1.32@6960.63,3531.5 v1(6960.63,3610.24)
  MidLayer1 w7.87: v1(6960.63,3610.24) 6960.63,4468.5 v1(6976.38,4484.25)
  MidLayer2 w5: v1(6976.38,4484.25) 7000,4484.25 7004.8,4479.45 8508.68,4479.45 8714.23,4685 9289,4685 9335,4731 9335,5205.5 9305.71,5234.79 v1(9305.71,5333.9)
  Bottom Layer w7.87: v1(9305.71,5333.9) R90.1@9305.71,5395.39
NetC127_1: C127.1 U8.5 | length 95.5
  Bottom Layer w5: C127.1@6886.49,5252.06 6886.49,5304.19 6893.4,5311.1 U8.5@6927,5311.1
NetC130_1: C130.1 D3.1 R56.1 | length 459.6
  Bottom Layer w11.81: C130.1@6917.32,2724.41 6917.32,2787.4 6929.13,2787.4 ; R56.1@6929.13,2882.36 6929.13,2787.4 ; D3.1@7183.07,2700.79 7135.83,2748.03 7102.36,2748.03 7062.99,2787.4 6929.13,2787.4
NetC131_2: C131.2 D3.3 | length 154.1
  Bottom Layer w11.81: D3.3@7145.67,2795.28 7196.85,2795.28 7236.22,2834.65 C131.2@7283.46,2834.65
NetC145_2: C145.2 U12.6 | length 255.1
  Bottom Layer w10: C145.2@4145.01,1178.45 4145.01,1224.78 4153.68,1233.45 4253.68,1233.45 4274.18,1253.95 U12.6@4274.18,1321.45
NetC151_1: C151.1 U12.10 | length 208
  Bottom Layer w15: C151.1@4153.68,1408.45 4155.77,1408.45 4177.8,1408.45 4193.68,1408.45 4249.18,1463.95 U12.10@4249.18,1553.45
NetC171_1: C171.1 R109.1 | length 150.1
  Bottom Layer w15.75: C171.1@2874.02,4866.14 R109.1@2874.02,5016.22
NetC171_2: C171.2 C172.1 R108.2 | length 295.5
  Bottom Layer w15.75: R108.2@2755.91,5016.22 C172.1@2755.91,4863.19 2755.91,4862.21 2803.15,4862.21 2814.96,4850.39 2814.96,4836.61 2828.74,4822.84 C171.2@2873.03,4822.84
NetC173_1: C173.1 R112.1 | length 150.1
  Bottom Layer w15.75: C173.1@2992.13,4866.14 R112.1@2992.13,5016.22
NetC175_1: C175.1 R113.1 | length 150.1
  Bottom Layer w15.75: C175.1@3346.46,4866.14 R113.1@3346.46,5016.22
NetC176_1: C176.1 R114.1 | length 150.1
  Bottom Layer w15.75: C176.1@3582.68,4866.14 R114.1@3582.68,5016.22
NetC178_1: C178.1 R115.1 | length 75.9
  Bottom Layer w7.87: C178.1@2755.91,5294.29 2759.84,5290.36 R115.1@2759.84,5220
NetC179_1: C179.1 R118.1 | length 300.9
  Bottom Layer w15.75: R118.1@3021.08,5414.63 3068.33,5414.63 3095.9,5442.2 3150.1,5442.2 3191.38,5483.48 3191.38,5544.18 3201.32,5554.12 C179.1@3228.68,5554.12
NetC179_2: C179.2 C181.1 R117.2 | length 238.5
  Bottom Layer w15: R117.2@3228.68,5414.63 C179.2@3228.68,5512.78 3248.01,5512.78 3263.68,5528.45 3263.68,5577.78 C181.1@3228.68,5612.78
NetC182_1: C182.1 R121.1 | length 82.2
  Bottom Layer w11.81: R121.1@2874.02,5220 C182.1@2874.02,5302.17
NetC183_1: C183.1 U17.22 | length 310
  Bottom Layer w11.81: U17.22@4236.22,5033.47 4408.43,5033.47 4493.82,4948.08 C183.1@4510.82,4948.08
NetC184_1: C184.1 R124.1 | length 150.1
  Bottom Layer w15.75: C184.1@3110.24,4866.14 R124.1@3110.24,5016.22
NetC185_1: C185.1 R125.1 | length 153
  Bottom Layer w15.75: C185.1@3228.35,4863.19 R125.1@3228.35,5016.22
NetC186_1: C186.1 R126.1 | length 443.6
  MidLayer2 w15.75: v1(3653.54,5236.22) 3700.79,5188.98 v1(3700.79,4926.77)
  Bottom Layer w15.75: v1(3653.54,5236.22) 3669.76,5220 R126.1@3700.79,5220 ; C186.1@3700.79,4866.14 v1(3700.79,4926.77)
NetC187_2: C187.2 R127.2 R132.1 | length 594.3
  MidLayer2 w15.75: v1(3047.24,5161.42) 3047.24,5279.53 3118.11,5350.39 v1(3312.99,5350.39)
  Bottom Layer w15.75: R132.1@2992.13,5177.64 3031.02,5177.64 v1(3047.24,5161.42) 3063.46,5177.64 R127.2@3110.24,5177.64 ; v1(3312.99,5350.39) 3312.99,5364.55 3317.54,5369.1 C187.2@3346.46,5369.1
NetC188_1: C188.1 R129.1 | length 151.5
  Bottom Layer w15.75: 3582.68,5236.22 3582.68,5295.67 3618.11,5331.1 C188.1@3618.11,5373.03
NetC188_2: C188.2 C189.1 R128.2 | length 513.7
  Bottom Layer w15.75: C188.2@3615.35,5416.54 3617.52,5414.37 C188.2@3618.11,5414.37 C189.1@3700.79,5414.37 3702.17,5412.99 3754.72,5412.99 3799.21,5368.5 R128.2@3799.21,5058.58
NetC190_1: C190.1 R130.2 R131.2 | length 299.9
  Bottom Layer w15.75: R130.2@3346.46,5567.4 3404.55,5567.4 ; C190.1@3464.57,5410.43 3464.57,5474.63 3404.55,5534.64 3404.55,5567.4 ; R131.2@3464.57,5567.4 3404.55,5567.4
NetC197_2: C197.2 R135.1 U18.1 U18.4 | length 260.1
  Bottom Layer w7.87: R135.1@2938.5,5751.97 2938.5,5818.9 2938.5,5824.33 2964.57,5850.39 2996.06,5850.39 ; U18.4@2996.06,5887.8 2996.06,5850.39 ; U18.1@3047.24,5814.96 3047.24,5842.52 3039.37,5850.39 2996.06,5850.39
NetC198_2: C198.2 U18.6 | length 76.6
  Bottom Layer w15.75: U18.6@3047.24,5887.8 3047.24,5923.24 3065.94,5941.94 C198.2@3065.94,5956.68
NetC256_1: C256.1 U48.13 | length 110
  Bottom Layer w12: U48.13@1392.5,3342.24 1392.5,3297.5 1421.18,3268.82 C256.1@1421.18,3244.09
NetC257_1: C257.1 U49.13 | length 89.5
  Bottom Layer w7.87: U49.13@4244.37,4458.46 4297.05,4458.46 4307.09,4468.5 C257.1@4329.72,4468.5
NetD9_1: D9.1 F3.1 | length 129.9
  Bottom Layer w50: D9.1@11357.26,3326.76 11385.83,3298.2 F3.1@11385.83,3208.66
NetD9_2: D9.2 DH1.10 | length 890.6
  Bottom Layer w50: D9.2@11193.88,3326.76 11262.11,3395 11453,3395 11575.58,3272.42 11575.58,3111.01 11437.01,2972.44 DH1.10@11437.01,2900
NetD10_1: D10.1 F4.1 | length 178.1
  Bottom Layer w40: D10.1@11157.46,2632.87 F4.1@11157.46,2811.02
NetD10_2: D10.2 DH2.10 | length 1235.4
  Bottom Layer w40: D10.2@11157.46,2469.48 11227.94,2399 11417,2399 11620,2196 11620,1741 11567.98,1688.98 DH2.10@11437.01,1688.98
NetD11_1: D11.1 F5.1 | length 136.8
  Bottom Layer w59.06: D11.1@821.16,3727.35 909.66,3727.35 928.72,3708.28 F5.1@950.04,3708.28
NetD11_2: D11.2 HDR3.10 | length 438.9
  Bottom Layer w60: HDR3.10@377.95,3981.1 377.95,3889.05 539.66,3727.35 D11.2@657.78,3727.35
NetF1_1: F1.1 J1.1 J3.1 | length 789.4
  Bottom Layer w150: J1.1@10059.24,5952.76 J1.1@10089.37,5952.76 10341.24,5952.76 10390,5904 10607,5904 10655.76,5952.76 J3.1@10739.76,5952.76 J3.1@10808.24,5952.76
NetF2_2: F2.2 JP3.2 | length 1298.7
  MidLayer2 w74.8: JP3.2@6455.12,5896.85 6376.85,5896.85 6349,5869 6349,5531 6382,5498 6655,5498 6778,5375 6778,5124
  Bottom Layer w15.75: F2.2@6759.83,5062.98 v2(6759.83,5110.23) ; F2.2@6795.26,5059.05 v2(6795.26,5110.23)
NetJ7_4: J7.4 JP3.4 | length 1054.9
  Top Layer w15.75: J7.4@6898.74,6259.84 v1(6898.84,5808.9)
  MidLayer3 w11.81: JP3.4@6555.12,5896.85 6509,5850.73 6509,5762 6527,5744 6878,5744 6898.84,5764.84 v1(6898.84,5808.9)
NetJP2_3: JP2.3 R54.1 | length 536.1
  Bottom Layer w7.87: JP2.3@6555.12,5596.85 6727.16,5596.85 6761.21,5562.8 R54.1@6761.21,5251.05 R54.1@6764.16,5253.99
NetL2_1: L2.1 U12.1 U12.3 U12.14 U12.16 | length 770.9
  Bottom Layer w18: 4349.18,1497.95 U12.14@4349.18,1553.45
  Bottom Layer w20: U12.3@4349.18,1321.45 4349.18,1378.95 ; U12.1@4399.18,1321.45 4399.18,1397.95 ; 4399.18,1473.95 U12.16@4399.18,1553.45
  Bottom Layer w150: 4523.68,1478.45 4523.68,1741.58 L2.1@4692.5,1910.4
NetQ1_1: Q1.1 Q3.3 R48.2 | length 353.9
  Bottom Layer w11.81: Q3.3@7336.93,2400.86 7336.94,2370.04 7349.42,2357.55 7501.9,2357.55 7531.82,2327.63 Q1.1@7531.82,2302.43 7531.82,2271.84 7515.6,2255.62 R48.2@7515.6,2223.69
NetQ1_2: Q1.2 Q3.1 R50.2 | length 168.1
  Bottom Layer w11.81: R50.2@7358.12,2223.69 7358.12,2248.25 7374.34,2264.47 Q3.1@7374.34,2302.43 Q1.2@7457.01,2302.43
NetQ2_1: Q2.1 Q4.3 R49.2 | length 360.9
  Bottom Layer w11.81: Q4.3@7018.04,2400.86 7018.04,2363.88 7030.28,2351.65 7194.57,2351.65 7212.92,2333.3 Q2.1@7212.92,2302.43 7212.92,2259.55 7196.7,2243.33 R49.2@7196.7,2223.69
NetQ2_2: Q2.2 Q4.1 R51.2 | length 168.1
  Bottom Layer w9.84: R51.2@7039.22,2223.69 7039.22,2253.61 7055.44,2269.83 Q4.1@7055.44,2302.43
  Bottom Layer w11.81: Q4.1@7055.44,2302.43 Q2.2@7138.12,2302.43
NetR1_1: R1.1 R2.2 U2.9 | length 278.9
  Bottom Layer w7.87: U2.9@9377.97,4916.76 9377.97,4861.03 ; R1.1@9396.76,4823 9396.76,4842.24 9377.97,4861.03 ; R2.2@9525.64,4823.89 9525.64,4848.36 9512.97,4861.03 9377.97,4861.03
NetR16_1: R16.1 U5.D24 | length 877.2
  Top Layer w7.87: U5.D24@10401.58,3818.9 v1(10421.26,3838.58)
  MidLayer1 w5: v1(10421.26,3838.58) 10465,3882.32 10534.68,3882.32
  MidLayer4 w5: v1(10421.26,3838.58) 10482.58,3838.58 10808,4164 10929.96,4164 v1(10948.35,4182.38)
  Bottom Layer w5: R16.1@10948.35,4153.35 v1(10948.35,4182.38) R16.1@10948.35,4163.07
NetR40_1: R40.1 VR1.3 | length 480.1
  Top Layer w11.81: VR1.3@8937.01,1488.19 VR1.3@8952.76,1488.19 ; VR1.3@8937.01,1504.19 9015.19,1504.19 9023.62,1512.62 v1(9023.62,1649.61)
  Bottom Layer w11.81: v1(9023.62,1649.61) 9102.61,1649.61 9123.53,1670.53 R40.1@9123.53,1799.21
NetR40_2: R40.2 R41.1 | length 255.9
  Bottom Layer w11.81: R41.1@8883.37,1799.21 8883.37,1822.37 8898,1837 9066,1837 9081.16,1821.84 R40.2@9081.16,1799.21
NetR42_2: R42.2 VR1.1 | length 230.4
  Top Layer w11.81: VR1.1@8937.01,1578.74 8961,1602.73 v2(8961,1742)
  Bottom Layer w11.81: v2(8961,1742) 8961.08,1764.08 R42.2@8961.08,1799.21
NetR53_2: R53.2 U8.4 | length 76.5
  Bottom Layer w9.84: U8.4@7033.1,5311.1 U8.4@7045.11,5311.1 7048.5,5311.1 7053.15,5306.45 R53.2@7053.15,5251.96
NetR57_1: R57.1 R58.2 R59.2 U9.4 | length 366.5
  Bottom Layer w11.81: U9.4@7653.54,2826.77 7766.32,2826.77 7771.65,2821.43 ; R58.2@7708.54,2735.75 7755.4,2735.75 7771.65,2752 ; R57.1@7771.65,2866.61 7771.65,2821.43 ; R59.2@7826.65,2735.75 7787.9,2735.75 7771.65,2752 ; 7771.65,2752 7771.65,2821.43
NetR61_2: R61.2 R62.1 | length 39.5
  Bottom Layer w7.87: R61.2@3208.68,1869 R62.1@3208.66,1908.45
NetR63_1: R63.1 R64.2 R65.2 U11.3 | length 411.9
  Bottom Layer w11.81: U11.3@6385.83,2566.93 6425.2,2566.93 ; R64.2@6504.41,2547.24 6444.88,2547.24 6425.2,2566.93 ; R65.2@6504.41,2645.67 6452.8,2645.67 6452.76,2645.71 ; R63.1@6504.41,2744.1 6464.24,2744.1 6452.76,2732.61 6452.76,2645.71 ; 6425.2,2566.93 6452.76,2594.49 6452.76,2645.71
NetR68_1: R68.1 R70.2 | length 45.4
  Bottom Layer w11.81: R68.1@4093.32,1602.63 R70.2@4138.68,1602.63
NetR69_2: R69.2 U12.7 | length 178.5
  Bottom Layer w10: R69.2@4142.86,1278.45 4167.86,1253.45 4238.68,1253.45 4249.18,1263.95 U12.7@4249.18,1321.45
NetR73_2: R73.2 R74.1 | length 39.5
  Bottom Layer w8: R74.1@1912.01,1538.45 R73.2@1951.54,1538.45
NetR76_1: R76.1 R77.1 | length 32.6
  Bottom Layer w8: R77.1@794.86,1523.45 R76.1@827.5,1523.45
NetR79_1: R79.1 R80.2 | length 42.6
  Bottom Layer w10: R79.1@1343.68,4361.03 R80.2@1343.68,4403.67
NetR110_2: R110.2 U17.21 | length 285
  Bottom Layer w11.81: U17.21@4236.22,5059.06 4406.62,5059.06 4432.95,5032.72 R110.2@4510.31,5032.72
NetR118_2: R118.2 R119.1 | length 326.4
  Bottom Layer w15: R118.2@3021.08,5372.27 3171.73,5372.27 3192,5352 3192,5256.35 R119.1@3228.35,5220
NetR136_1: R136.1 U18.5 | length 149.7
  Bottom Layer w7.87: R136.1@2938.5,5889.76 2938.5,5914.88 2952.76,5929.13 3011.81,5929.13 3021.65,5919.29 U18.5@3021.65,5887.8
NetR313_2: R313.2 U51.5 | length 201.2
  Top Layer w15.75: v1(7804,5317) 7832,5289 7886,5289 7928.69,5331.69 U51.5@7952.76,5331.69
  Bottom Layer w15.75: v1(7804,5317) 7804.39,5317.39 R313.2@7827.02,5317.39
NetR314_1: R314.1 U50.2 U52.42 | length 1584.2
  Top Layer w5: U52.42@8147.64,4885.24 8147.64,4860.24 8157.48,4850.39 v1(8177.17,4850.39)
  MidLayer3 w5: v1(7013,4670.93) 7034.07,4692 8157,4692 8177.17,4712.17 v1(8177.17,4850.39)
  Bottom Layer w7.87: R314.1@8091.02,4748.03 8091.02,4799.82 8117.98,4826.77 8153.54,4826.77 v1(8177.17,4850.39)
  Bottom Layer w11.81: v1(7013,4670.93) U50.2@7060.24,4670.93
NetR315_2: R315.2 U52.13 | length 2745.9
  Top Layer w5: U52.13@7911.42,5193.9 U52.13@7911.41,5197.78 7911.42,5214.57 7905.51,5220.47 7901.66,5220.47 7881.89,5240.24 7881.89,5248.03 7858.27,5271.65 7787.4,5271.65 7771.65,5255.91 7771.65,5074.8 7729,5032.15 7729,4802.5 8141.73,4389.76 9468.5,4389.76 9503.94,4354.33 v2(9503.94,4275.59)
  Bottom Layer w5: v2(9503.94,4275.59) 9503.94,4296.83 9506.36,4299.26 R315.2@9506.36,4314.95
NetR318_2: R318.2 U52.15 | length 226.9
  Top Layer w7.87: v1(7842.52,5248.03) 7842.52,5181.1 7852.36,5171.26 7865.35,5171.26 U52.15@7869.09,5171.26
  Bottom Layer w7.87: R318.2@7767.9,5317.39 7767.9,5273.13 7793,5248.03 v1(7842.52,5248.03)
NetR319_2: R319.2 U52.16 | length 287.1
  Top Layer w5: v1(7799.21,5212.6) 7799.21,5187.92 7835.56,5151.57 7865.35,5151.57 U52.16@7869.09,5151.57
  Bottom Layer w5: R319.2@7708.78,5317.39 7708.78,5242.82 7739,5212.6 v1(7799.21,5212.6)
NetTP2_1: TP2.1 U2.1 Y1.2 | length 832.9
  Bottom Layer w7.87: TP2.1@9003.27,5571.82 9038,5537.09 9038,5184.2 9195.63,5026.57 9236.31,5026.57 9347.54,5026.57 9358.29,5037.32 U2.1@9358.29,5078.18
NetU2_2: U2.2 Y1.1 | length 249.8
  Bottom Layer w7.87: Y1.1@9257.91,4932.87 9257.91,5012.21 9259.4,5013.7 9352.87,5013.7 9377.97,5038.8 U2.2@9377.97,5078.18
OUTA1: U31.2 U48.1 | length 282.4
  Bottom Layer w5: U31.2@1070.96,3503.94 1070.97,3570.97
  Bottom Layer w7.87: 1070.97,3570.97 1070.97,3587.97 1080.36,3597.36 1213.87,3597.36 1217.5,3593.74 U48.1@1217.5,3547.24
OUTA2: U34.2 U48.2 | length 472.5
  Bottom Layer w5: U34.2@923.33,3503.94 923.33,3573.9
  Bottom Layer w7.87: 923.33,3573.9 923.33,3588.68 944.88,3610.24 1236.76,3610.24 1242.5,3604.5 U48.2@1242.5,3547.24
OUTA3: U37.2 U48.3 | length 672.1
  Bottom Layer w5: U37.2@775.69,3503.94 775.69,3573.9
  Bottom Layer w7.87: 775.69,3573.9 775.69,3602.46 799.21,3625.98 1256.02,3625.98 1267.5,3614.5 U48.3@1267.5,3547.24
OUTA4: U40.2 U48.4 | length 871.8
  Bottom Layer w5: U40.2@628.05,3503.94 628.05,3573.9
  Bottom Layer w7.87: 628.05,3573.9 628.05,3608.37 661.42,3641.73 1283.27,3641.73 1292.5,3632.5 U48.4@1292.5,3547.24
OUTA5: U43.2 U48.5 | length 1356.8
  Bottom Layer w5: U43.2@186.11,3502.9 186.11,3577.59
  Bottom Layer w7.87: 186.11,3577.59 186.11,3598.11 206.11,3618.11 602.36,3618.11 641.73,3657.48 1309.52,3657.48 1317.5,3649.5 U48.5@1317.5,3547.24
OUTB1: U29.2 U48.6 | length 2548.5
  Bottom Layer w5: U29.2@2970.57,4409.45 2970.57,4494
  Bottom Layer w7.87: U48.6@1342.5,3547.24 1342.5,3628.2 1395.72,3681.42 1885.32,3681.42 1893.7,3689.8 1893.7,3944.88 2011.81,4062.99 2149.61,4062.99 2224.41,4137.8 2224.41,4444.88 2354.33,4574.8 2889.76,4574.8 2970.57,4494
OUTB2: U32.2 U48.7 | length 2368.6
  Bottom Layer w5: 2759.84,4559.06 2822.93,4495.96 U32.2@2822.93,4409.45
  Bottom Layer w7.87: U48.7@1367.5,3547.24 1367.5,3630.2 1405.84,3668.54 1901.33,3668.54 1909.45,3676.67 1909.45,3937.01 2019.69,4047.24 2157.48,4047.24 2244.09,4133.86 2244.09,4441.74 2361.41,4559.06 2759.84,4559.06
OUTB3: U35.2 U48.8 | length 2183.9
  Bottom Layer w5: U35.2@2675.3,4409.45 2675.3,4494
  Bottom Layer w7.87: U48.8@1392.5,3547.24 1392.5,3632.2 1415.97,3655.67 1906.66,3655.67 1925.2,3674.21 1925.2,3929.13 2027.56,4031.5 2169.29,4031.5 2263.78,4125.98 2263.78,4440.94 2366.14,4543.31 2625.98,4543.31 2675.3,4494
OUTB4: U38.2 U48.9 | length 1916.1
  Bottom Layer w5: U38.2@2380.02,4409.45 2380.02,4482.18
  Bottom Layer w7.87: U48.9@1417.5,3547.24 1417.5,3488.5 1421.75,3484.25 1452.64,3484.25 1468.39,3500 1468.39,3615.39 1482.92,3629.92 1917.32,3629.92 1956.69,3669.29 1956.69,3913.39 2043.31,4000 2188.98,4000 2303.15,4114.17 2303.15,4440.94 2350.39,4488.19 2374.02,4488.19 2380.02,4482.18
OUTB5: U41.2 U48.10 | length 1959.2
  Bottom Layer w5: U41.2@2527.66,4409.45 2527.66,4492.03
  Bottom Layer w7.87: U48.10@1442.5,3547.24 1442.5,3617.2 1468.1,3642.8 1911.99,3642.8 1940.94,3671.75 1940.94,3921.26 2035.43,4015.75 2177.17,4015.75 2283.46,4122.05 2283.46,4440.94 2366.14,4523.62 2496.06,4523.62 2527.66,4492.03
OUTC1: U30.2 U49.4 | length 1018.1
  Bottom Layer w5: U30.2@3265.85,4409.45 3265.85,4498.13
  Bottom Layer w7.87: 3265.85,4498.13 3299.21,4531.5 3935.3,4531.5 3970.13,4496.67 3970.13,4380.45 3993,4357.58 4039.37,4357.58 U49.4@4041.34,4357.58
OUTC2: U33.2 U49.2 | length 718.5
  Bottom Layer w5: U33.2@3561.12,4409.45 3561.12,4486.32
  Bottom Layer w7.87: 3561.12,4486.32 3574.8,4500 3930.38,4500 3944.38,4486 3944.38,4356.2 3993,4307.58 4039.37,4307.58 U49.2@4041.34,4307.58
OUTC3: U36.2 U49.3 | length 862
  Bottom Layer w5: U36.2@3413.48,4409.45 3413.48,4480.41
  Bottom Layer w7.87: 3413.48,4480.41 3448.82,4515.75 3932.84,4515.75 3957.25,4491.33 3957.25,4367.33 3992,4332.58 4039.37,4332.58 U49.3@4041.34,4332.58
OUTC4: U39.2 U49.1 | length 559.2
  Bottom Layer w5: U39.2@3708.76,4409.45 3708.76,4476.48
  Bottom Layer w7.87: 3708.76,4476.48 3716.54,4484.25 3921.13,4484.25 3931.5,4473.87 3931.5,4349.5 3998.42,4282.58 4039.37,4282.58 U49.1@4041.34,4282.58
OUTC5: U42.2 U49.5 | length 1165.6
  Bottom Layer w5: U42.2@3118.21,4409.45 3118.21,4504.03
  Bottom Layer w7.87: 3118.21,4504.04 3161.42,4547.24 3937.75,4547.24 3983,4502 3983,4396.58 3997,4382.58 4039.37,4382.58 U49.5@4041.34,4382.58
OUTDB1: U44.2 U48.12 | length 8328.7
  Bottom Layer w7.87: U48.12@1417.5,3342.24 1417.5,3393.5 1422,3398 1452,3398 1464,3386 1464,3206 1449.33,3191.33 1410.33,3191.33 1404,3185 1404,3121.36 1423,3102.36 1790.84,3102.36 2519.93,2373.27 4272.38,2373.27 4859.19,2960.08 5389.87,2960.08 5408,2978.21 5408,3896 5437.2,3925.2 7767.72,3925.2 7783.56,3941.04 U44.2@7783.56,3976.38
OUTDB2: U46.2 U48.11 | length 8445.2
  Bottom Layer w7.87: U48.11@1442.5,3342.24 1442.5,3211.5 1435.21,3204.21 1405,3204.21 1391.13,3190.33 1391.13,3114.55 1423,3082.68 1792.32,3082.68 2514.6,2360.39 4277.72,2360.39 4864.53,2947.2 5395.2,2947.2 5420.87,2972.87 5420.87,3890.67 5439.66,3909.45 7807.09,3909.45 7866.14,3968.5 7905.51,3968.5 7948.82,3925.2 7980.32,3925.2 7990.26,3935.14 U46.2@7990.26,3976.38
OUTUHA: U45.2 U49.6 | length 4714.1
  MidLayer2 w7.87: v1(4507.87,2771.65) 4507.87,2700.79 4909.45,2299.21 v1(4909.45,2023.62)
  MidLayer3 w7.87: v1@5057,1122 5111.87,1067.13 5203.63,1067.13 v1(5221.76,1049)
  Bottom Layer w5: U49.6@4039.37,4408.46 4085.63,4408.46 4090.55,4403.54 4090.55,4267.72 4074.8,4251.97 3976.38,4251.97 3905.51,4181.1 3905.51,3812 3947.51,3770 4305,3770 4424.28,3650.72 4424.28,2898.55 4507.87,2814.96 v1(4507.87,2771.65)
  Bottom Layer w7.87: v1(4909.45,2023.62) 5015.75,1917.32 5015.75,1163.25 v1@5057,1122 ; v1@5222.65,1049 5252.57,1019.09 5427.87,1019.09 5456.78,1048 5456.78,1109.64 5446.84,1119.58 U45.2@5417.41,1119.58
  other v1: 5056.1,1122
OUTUHB: U47.2 U49.7 | length 6185.5
  MidLayer2 w7.87: v1(4539.37,2771.65) 4539.37,2708.66 4937.01,2311.02 4937.01,2015.75 v1(4909.45,1988.19)
  MidLayer3 w7.87: v1@5023,1109 5092,1040 v1(5191.39,1040)
  Bottom Layer w5: U49.7@4039.37,4433.46 4086.22,4433.46 4102.36,4417.32 4102.36,4263.78 4078.74,4240.16 3980.31,4240.16 3917.32,4177.17 3917.32,3818 3955.32,3780 4358,3780 4434.28,3703.72 4434.28,2908.24 4539.37,2803.15 v1(4539.37,2771.65)
  Bottom Layer w7.87: v1(4909.45,1988.19) 4996.06,1901.57 4996.06,1134.94 5022,1109 v1@5023,1109 ; v1@5192.28,1040 5238.28,994 5440,994 5477,1031 5477,1197 5532,1252 6061,1252 6279.08,1033.92 6493.1,1033.92 6524.18,1065 6524.18,1108.72 6510.3,1122.6 U47.2@6473,1122.6
  other v1: 5022.1,1109
PBCTRLA.1W.ID: EXTHDR1.61 R142.1 U5.N1 | length 9653.1
  Top Layer w5: v5(6240.16,3393.7) 6303.15,3393.7 6326.77,3370.08 6326.77,3287.4 6468.72,3145.45 8224.68,3145.45 8718.68,3639.45 9100.11,3639.45 9128.77,3610.79 9229.79,3610.79 9376.01,3464.57 U5.N1@9496.06,3464.57
  Top Layer w7.87: v1(1047.24,3007.87) EXTHDR1.61@1047.24,3086.61
  MidLayer1 w5: v1(1047.24,3007.87) 1047.24,2921.26 1059.05,2909.45 2505.68,2909.45 2651.35,3055.12 2787.4,3055.12 2799.21,3043.31 2830.71,3043.31 2972.44,2901.58 3634.58,2901.58 3673.95,2940.95 4598.43,2940.95 4610.24,2952.76 4834.65,2952.76 4940.95,3059.06 4940.95,3295.28 5047.24,3401.58 6192.91,3401.58 6200.79,3393.7 v5(6240.16,3393.7)
  Bottom Layer w10: R142.1@949.86,2958.45 1023.68,2958.45 1047.24,2982.02 v1(1047.24,3007.87)
PBCTRLA.1W.PIO1: EXTHDR1.69 U5.C10 | length 10365.3
  Top Layer w7.87: v1(9830.71,3877.95) U5.C10@9850.39,3858.27
  Top Layer w10: EXTHDR1.69@921.26,3086.61 921.26,3173.23 1415.52,3667.49 1596.63,3667.49 1901.57,3972.44 1901.57,4397.64 1985.94,4482 6712.55,4482 6959,4728.45 7683.68,4728.45 v1@7838.68,4573.45
  MidLayer1 w5: v1(7838.7,4573.46) 8093.71,4318.45 9193.68,4318.45 9300.14,4212 9655.99,4212 9815.68,4052.31 9815.68,3987.45 9833.68,3969.45 9833.68,3944.4 9830.71,3941.43 v1(9830.71,3877.95)
PBCTRLA.1W.PIO2: EXTHDR1.71 U5.D10 | length 10495.3
  Top Layer w7.87: v1(9830.71,3838.58) U5.D10@9850.39,3818.9
  Top Layer w10: EXTHDR1.71@889.76,3086.61 889.76,3173.23 1405.41,3688.88 1596.8,3688.88 1886.57,3978.65 1886.57,4422.01 1966.77,4502.2 6701.75,4502.2 6948,4748.45 7708.68,4748.45 v1@7883.68,4573.45
  MidLayer1 w5: v1@7883.68,4573.45 8128.68,4328.45 9200.68,4328.45 9307.13,4222 9660.14,4222 9862.2,4019.93 9862.2,3976.38 9850.39,3964.57 9850.39,3858.27 v1(9830.71,3838.58) ; 9862.13,4000 9862.2,4000
  other v1: 7883.7,4573.46
PBCTRLA.CLK.CLK0: EXTHDR1.51 U5.R5 | length 9196.9
  Top Layer w5: EXTHDR1.51@1204.72,3086.61 1204.72,3007.87 1228.35,2984.25 1307.09,2984.25 v1(1330.71,3007.87)
  Top Layer w7.87: v1(9633.86,3366.14) U5.R5@9653.54,3385.83
  MidLayer2 w5: v1(1330.71,3007.87) 1330.71,2984.25 1342.52,2972.44 2751.97,2972.44 2791.34,2933.07 2897.64,2933.07 2913.39,2917.32 4500,2917.32 4566.93,2984.25 5157.48,2984.25 5338.58,3165.35 5338.58,3228.35 5507.87,3397.64 6023.62,3397.64 6358.27,3062.99 8364.84,3062.99 8616.81,3314.96 9045.99,3314.96 9152.95,3208 9294.23,3208 9344.57,3258.35 9358.38,3258.35 9434.68,3334.65 ; 9433.07,3334.65 9492.13,3334.65 9503.94,3346.46 9614.17,3346.46 v1(9633.86,3366.14)
PBCTRLA.CLK.CLK1: EXTHDR1.45 U5.T5 | length 9083
  Top Layer w7.87: v1(1299.21,3007.87) EXTHDR1.45@1299.21,3086.61 ; v1(9633.86,3326.77) U5.T5@9653.54,3346.46
  MidLayer2 w5: v1(1299.21,3007.87) 1299.21,2984.25 1322.83,2960.63 2744.09,2960.63 2783.46,2921.26 2893.7,2921.26 2909.45,2905.51 4503.94,2905.51 4570.87,2972.44 5165.35,2972.44 5350.39,3157.48 5350.39,3220.47 5515.75,3385.83 6019.69,3385.83 6354.33,3051.18 8369.73,3051.18 8621.7,3303.15 9043.66,3303.15 9148.81,3198 9298.37,3198 9348.72,3248.35 9362.52,3248.35 9433.07,3318.9 9492.13,3318.9 9503.94,3307.09 9614.17,3307.09 v1(9633.86,3326.77)
PBCTRLA.CLK.CLK2: EXTHDR1.47 U5.U5 | length 9096.7
  Top Layer w7.87: v1(1267.72,3007.87) EXTHDR1.47@1267.72,3086.61 ; v1(9633.86,3287.4) U5.U5@9653.54,3307.09
  MidLayer2 w5: v1(1267.72,3007.87) 1267.72,2984.25 1303.15,2948.82 2219.31,2948.82 2258.68,2909.45 2889.76,2909.45 2905.51,2893.7 4507.87,2893.7 4574.8,2960.63 5173.23,2960.63 5362.2,3149.61 5362.2,3212.6 5523.62,3374.02 6015.75,3374.02 6350.39,3039.37 8374.62,3039.37 8626.59,3291.34 9041.33,3291.34 9144.67,3188 9302.51,3188 9352.86,3238.35 9482.44,3238.35 9511.81,3267.72 9614.17,3267.72 v1(9633.86,3287.4)
PBCTRLA.CLK.EN: EXTHDR1.49 U5.V5 | length 9122.4
  Top Layer w7.87: v1(1236.22,3007.87) EXTHDR1.49@1236.22,3086.61 ; v1(9633.86,3248.03) U5.V5@9653.54,3267.72
  MidLayer2 w5: v1(1236.22,3007.87) 1236.22,2980.31 1279.53,2937.01 2209.13,2937.01 2248.5,2897.64 2885.83,2897.64 2901.57,2881.89 4511.81,2881.89 4578.74,2948.82 5181.1,2948.82 5336.37,3104.08 5374.02,3141.73 5374.02,3204.73 5531.5,3362.21 6011.81,3362.21 6346.46,3027.56 8379.52,3027.56 8631.48,3279.53 9039,3279.53 9140.53,3178 9306.65,3178 9357,3228.35 9409.45,3228.35 9433.07,3228.35 9614.17,3228.35 v1(9633.86,3248.03)
PBCTRLA.JTAG.DETECT: R206.1 R207.1 U5.N20 | length 10667.9
  Top Layer w7.87: U5.N20@10244.09,3464.57 v5(10266.14,3485.04)
  MidLayer3 w5: v2(1535.43,3389.76) 1535.43,3454.36 1477.61,3512.18 1477.61,3623.28 2078.74,4224.41 4673.23,4224.41 4748.03,4149.61 9165.51,4149.61 9290.7,4274.8 9361.2,4274.8 9446.85,4360.45 10222.55,4360.45 10407,4176 10407,3943.39 10452.76,3897.64 10452.76,3523.62 10433.07,3503.94 10283.47,3503.94 v5(10266.14,3485.04)
  Bottom Layer w11.81: R207.1@1535.43,3322.36 R206.1@1535.43,3455.2
PBCTRLA.JTAG.HARD.TCK: R193.1 R197.1 U5.G20 | length 10041
  Top Layer w7.87: U5.G20@10244.09,3700.79 v1(10263.78,3720.47)
  MidLayer3 w5: v2(2007.87,3387.8) 1898,3497.67 1844.85,3497.67 1807.09,3535.43 1807.09,3854.33 2110.35,4157.6 4645.55,4157.6 4720.36,4082.79 9185.16,4082.79 9317.16,4214.8 9534.94,4214.8 9607.6,4287.45 10210.69,4287.45 10313,4185.15 10313,3940 10272.57,3899.57 10254.7,3899.57 10244.1,3888.96 10244.09,3740.16 v1(10263.78,3720.47)
  Bottom Layer w11.81: R197.1@2007.87,3322.36 R193.1@2007.87,3453.23
PBCTRLA.JTAG.HARD.TDI: R190.1 R194.1 U5.G19 | length 10062
  Top Layer w7.87: U5.G19@10204.72,3700.79 v1(10224.41,3720.47)
  MidLayer3 w5: v2(2086.61,3387.8) 1994.77,3479.64 1933.75,3479.64 1818.9,3594.49 1818.9,3850.39 2114.97,4146.46 4640.94,4146.46 4715.74,4071.66 9189.77,4071.66 9322.91,4204.8 9539.08,4204.8 9609.74,4275.45 10208.55,4275.45 10303,4181 10303,3944.14 10268.43,3909.57 10228.47,3909.57 10204.72,3885.83 10204.72,3740.16 v1(10224.41,3720.47)
  Bottom Layer w11.81: R194.1@2086.61,3322.36 R190.1@2086.61,3453.23
PBCTRLA.JTAG.HARD.TDO: R191.1 R195.1 U5.G18 | length 10078.6
  Top Layer w7.87: U5.G18@10165.35,3700.79 v1(10185.04,3721.26)
  MidLayer3 w5: v2(2165.35,3387.8) 2144.08,3409.07 2086.99,3409.07 1828.9,3667.17 1828.9,3844.65 2119.58,4135.33 4636.33,4135.33 4711.13,4060.52 9194.38,4060.52 9286.05,4152.19 9328.66,4194.8 9543.23,4194.8 9610.88,4262.45 10207.41,4262.45 10293,4176.86 10293,3948.28 10264.28,3919.57 10199.1,3919.57 10165.35,3885.83 10165.35,3740.16 v1(10185.04,3721.26)
  Bottom Layer w11.81: R195.1@2165.35,3322.36 R191.1@2165.35,3453.23
PBCTRLA.JTAG.HARD.TMS: R192.1 R196.1 U5.H20 | length 10035.4
  Top Layer w7.87: U5.H20@10244.09,3661.42 v1(10263.78,3681.1)
  MidLayer3 w5: v2(1929.13,3387.8) 1795.28,3521.65 1795.28,3858.27 2105.74,4168.73 4650.17,4168.73 4724.97,4093.93 9180.54,4093.93 9272.21,4185.6 9311.41,4224.8 9530.8,4224.8 9605.45,4299.45 10212.84,4299.45 10323,4189.29 10323,3925.53 10283.47,3886 10283.47,3700.79 v1(10263.78,3681.1)
  Bottom Layer w11.81: R196.1@1929.13,3322.36 R192.1@1929.13,3453.23